# Altium PCB NB3000XN.PcbDoc (part 60 of 71)
Units mil, origin at the board's own origin, x right, y up, seen from the top; angles counter-clockwise.
Board outline 9527.56 x 6929.77 mil, 6 copper layers (Top Layer, GND+SHIELD, MidLayer1, MidLayer2, P2 - 3V3+5V0, Bottom Layer), stack 62.375 mil thick; 832 components, 1027 nets, 4655 pads, 4981 vias.
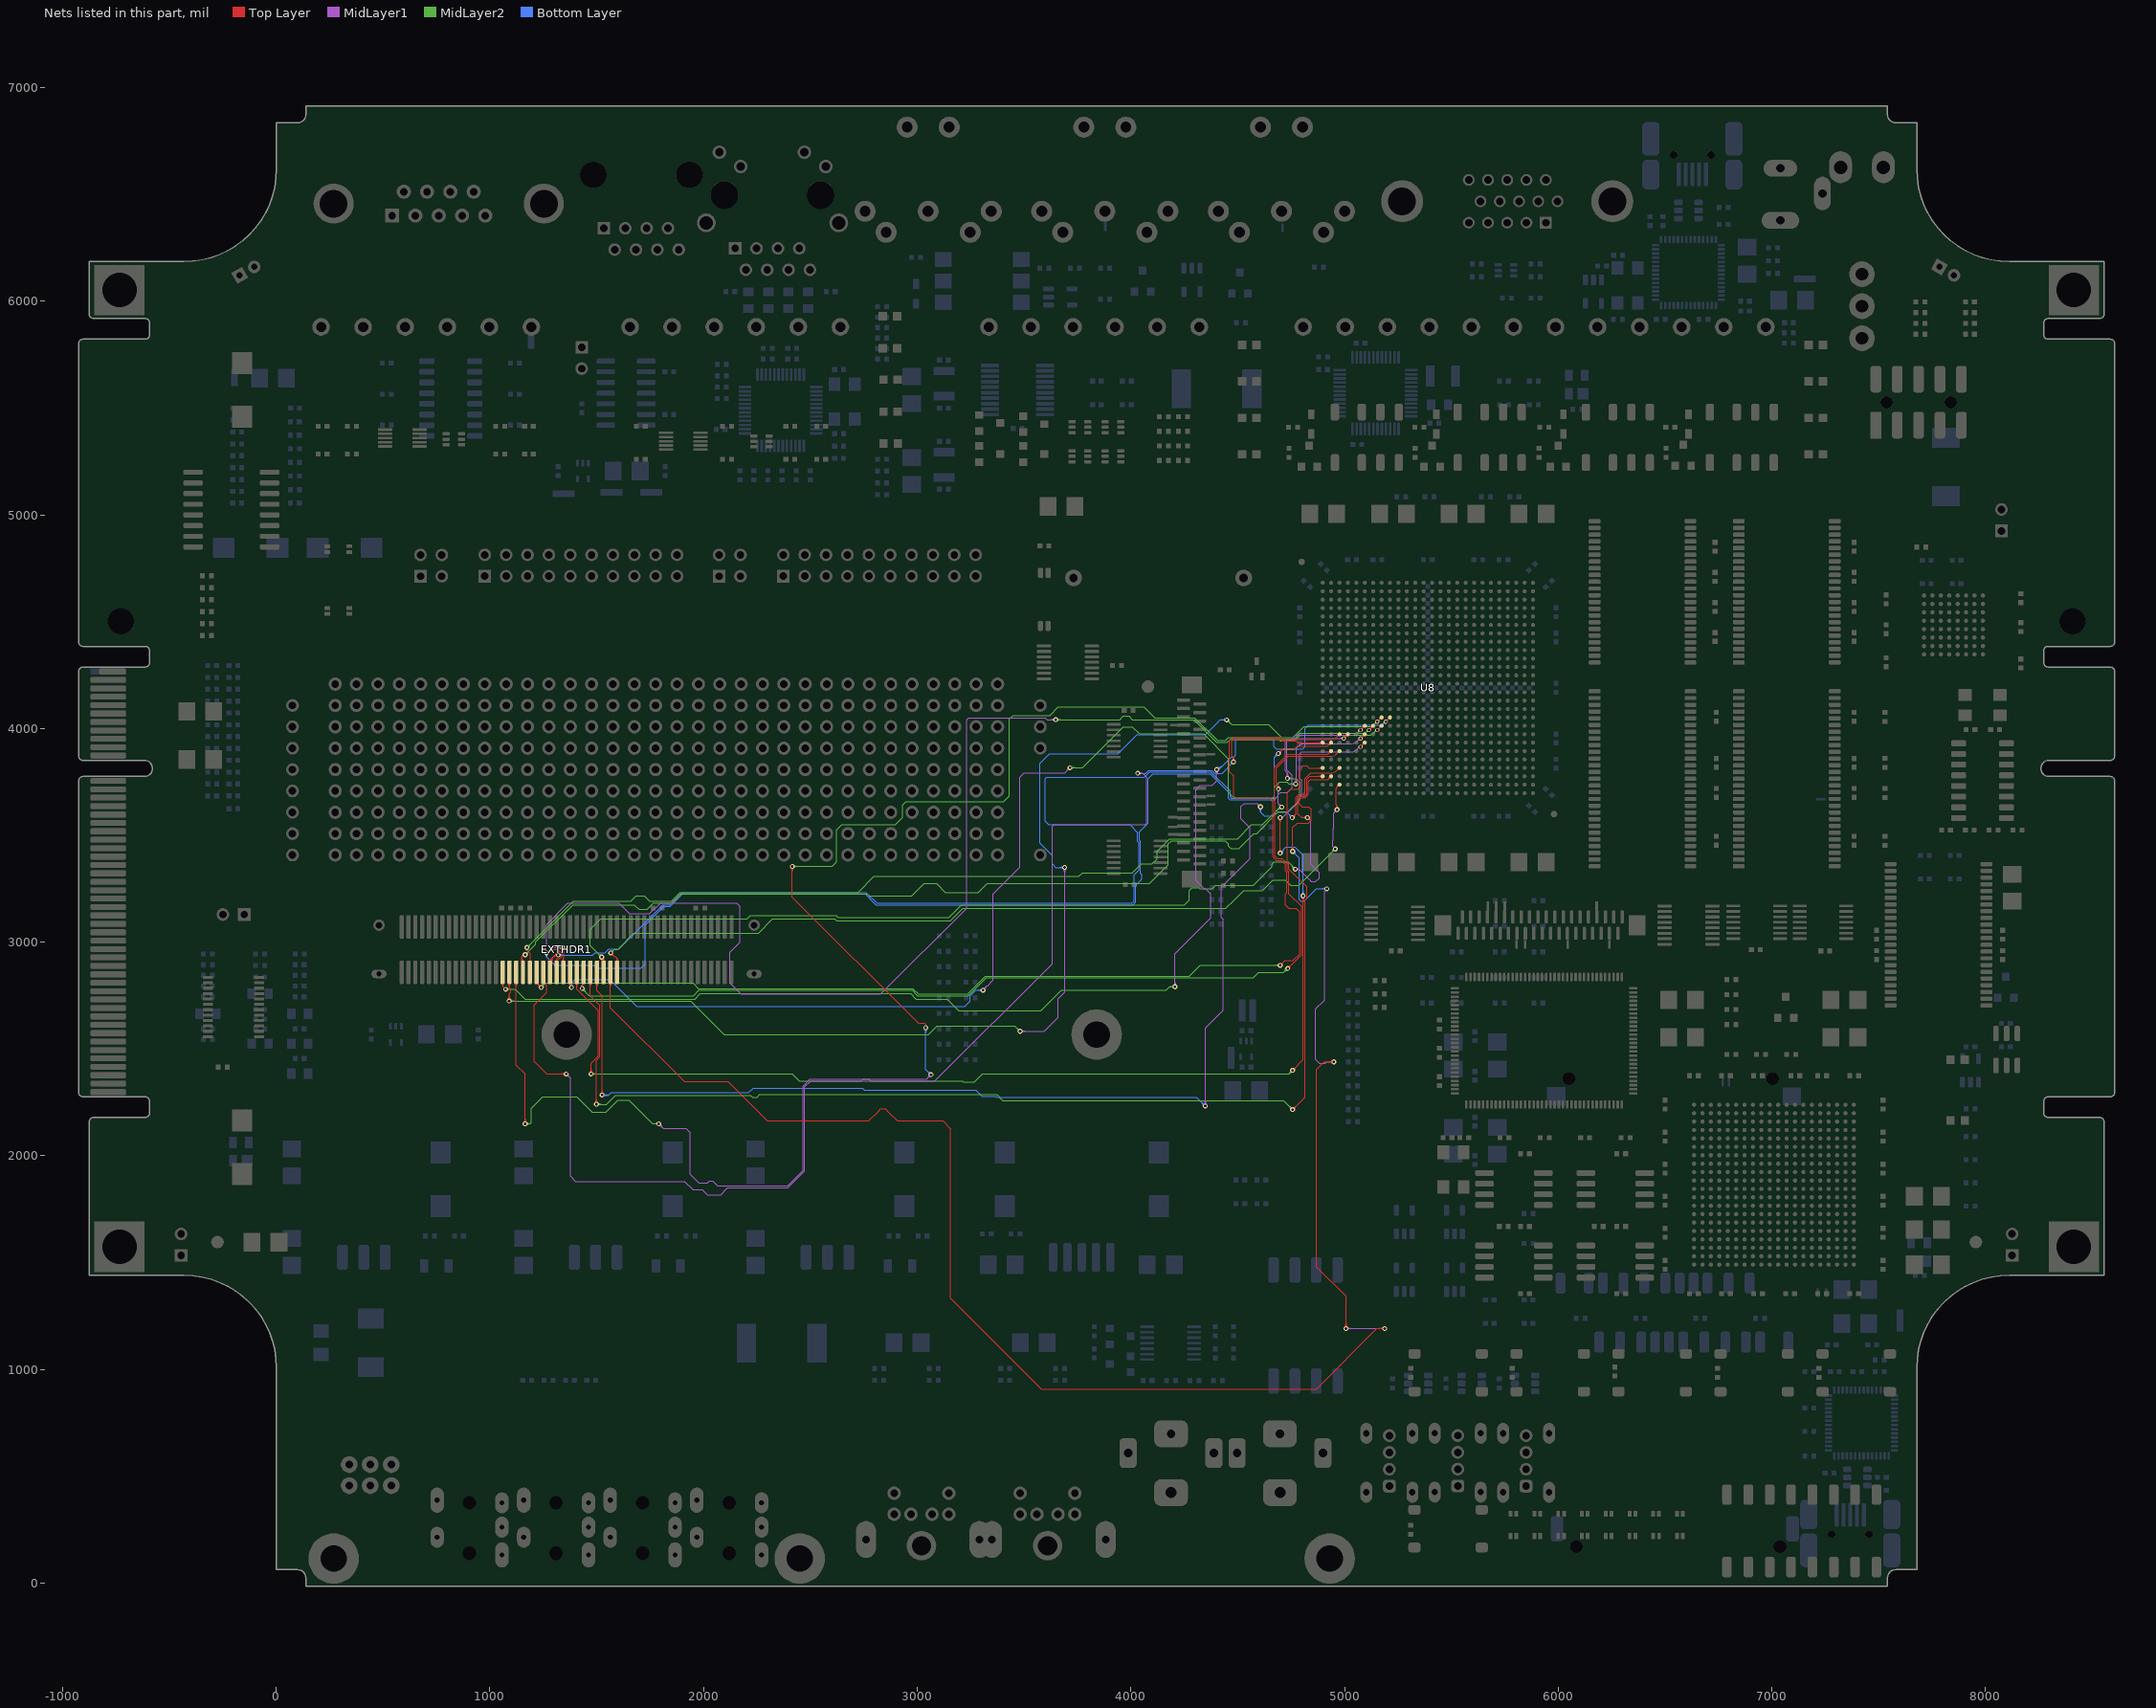
[diagram p64: the nets of this part, all layers, seen from the top]

## Via types
v1: diameter 23, hole 11.81, Top Layer to Bottom Layer, 3672 vias
v2: diameter 26, hole 11.81, Top Layer to Bottom Layer, 461 vias
v3: diameter 19, hole 11.81, Top Layer to Bottom Layer, tented both sides, 396 vias
v4: diameter 23.62, hole 11.81, Top Layer to Bottom Layer, 288 vias
v5: diameter 20, hole 11.81, Top Layer to Bottom Layer, 91 vias
v6: diameter 23, hole 11.81, Top Layer to Bottom Layer, tented both sides, 50 vias
v7: diameter 31, hole 11.81, Top Layer to Bottom Layer, 15 vias
v8: diameter 27.56, hole 11.81, Top Layer to Bottom Layer, tented both sides, 4 vias
v9: diameter 29, hole 11.81, Top Layer to Bottom Layer, 3 vias
v10: diameter 21, hole 11.81, Top Layer to Bottom Layer, 1 vias

## Nets (pads, with @x,y where several pads share a name; then routed paths per layer and width w, separated by ;. In a path a pad name is that pad's centre, name@x,y a point inside that pad or via, vN(x,y) a via of type N, cw(c..) or ccw(c..) an arc to the next point about the centre after c; other vN are vias at no path point) (continued)
PBIO.D17: EXTHDR1.36 U8.AE3 | length 4379.4
  Top Layer w4: v1@1565.19,2940.54 cw(c1565.19,2917.61) 1581.41,2933.82 cw(c1597.63,2950.04) v1@1574.69,2950.04 ; v1@1565.19,2944.54 cw(c1565.19,2931.26) 1574.58,2940.65 cw(c1583.97,2950.04) v1@1570.69,2950.04 ; v1(1565.19,2950.04) 1581.86,2933.37 1587.89,2933.37 1595.89,2925.37 EXTHDR1.36@1595.89,2859.25 ; EXTHDR1.36@1590.23,2910.03 ccw(c1576.57,2923.68) 1595.89,2923.68 ccw(c1615.2,2923.68) EXTHDR1.36@1601.55,2910.03 ; v1@4959.39,3627.9 ccw(c4950.27,3639.71) 4965.19,3639.71 ; v1(4965.19,3620.37) 4965.19,3639.71 ; v1@4970.99,3627.9 cw(c4980.11,3639.71) 4965.19,3639.71 ; 4961.11,3717.53 cw(c4971.26,3717.53) 4964.08,3724.71 ; 4961.11,3717.53 cw(c4971.26,3717.53) 4964.08,3724.71 ; 4961.11,3717.53 4961.11,3670 4961.11,3660 4961.11,3643.71 4962.44,3642.37 4962.52,3642.37 4965.19,3639.71 ; 4964.08,3724.71 cw(c4976.61,3712.17) 4976.61,3729.9 ccw(c4976.61,3712.17) 4964.08,3724.71 ; 4964.08,3724.71 ccw(c4951.55,3737.24) 4969.27,3737.24 cw(c4951.55,3737.24) 4964.08,3724.71
  MidLayer1 w4: v1@4955.69,3620.37 cw(c4932.76,3620.37) 4948.97,3604.16 cw(c4965.19,3587.94) v1@4965.19,3610.87 ; v1(4956.86,3436.71) 4945,3448.56 4945,3477.48 4947.52,3480 4947.52,3532.37 4948.52,3533.37 4948.52,3603.71 v1(4965.19,3620.37) ; v1@4959.69,3620.37 cw(c4946.41,3620.37) 4955.8,3610.99 cw(c4965.19,3601.6) v1@4965.19,3614.87
  MidLayer2 w4: v1(1565.19,2950.04) 1581.86,2966.71 1598.52,2966.71 1673.52,3041.71 2256.86,3041.71 2323.86,3108.71 2614.25,3108.71 2622.58,3100.37 3154.82,3100.37 3213.15,3158.71 4444.52,3158.71 4485.26,3199.44 4519.19,3233.37 4527.86,3242.04 4616.86,3242.04 4636.33,3261.52 4665.19,3290.37 4723.52,3290.37 4747.19,3266.71 4786.86,3266.71 v1(4956.86,3436.71) ; v1@1565.19,2955.54 ccw(c1565.19,2968.82) 1574.58,2959.43 ccw(c1583.97,2950.04) v1@1570.69,2950.04 ; v1@1565.19,2959.54 ccw(c1565.19,2982.48) 1581.41,2966.26 ccw(c1597.63,2950.04) v1@1574.69,2950.04 ; v1@4947.36,3436.71 cw(c4924.42,3436.71) 4940.64,3420.49 cw(c4956.86,3404.27) v1@4956.86,3427.21 ; v1@4951.36,3436.71 cw(c4938.08,3436.71) 4947.47,3427.32 cw(c4956.86,3417.93) v1@4956.86,3431.21
PBIO.D18: EXTHDR1.38 U8.AD2 | length 9271.8
  Top Layer w4: EXTHDR1.38@1558.74,2808.48 cw(c1545.08,2794.82) 1564.39,2794.82 cw(c1583.71,2794.82) EXTHDR1.38@1570.05,2808.48 ; EXTHDR1.38@1564.39,2859.25 1564.39,2692.51 ; 1614.73,2642.17 1564.39,2692.51 ; 2127.29,2334.02 2114.31,2347 ; v1@4750.14,3431.76 ccw(c4733.92,3447.98) 4756.86,3447.98 ccw(c4779.79,3447.98) v1@4763.57,3431.76 ; v1@4752.97,3428.93 ccw(c4743.58,3438.32) 4756.86,3438.32 ccw(c4770.14,3438.32) v1@4760.75,3428.93 ; v1(4756.86,3425.04) 4756.86,3536.86 4778.37,3558.37 4831.86,3558.37 4843.86,3570.37 4843.86,3621.37 4831.86,3633.37 4802.52,3633.37 4789.19,3646.71 4789.19,3666.71 4797.52,3675.04 4815.19,3675.04 4831.86,3691.71 4831.86,3753.17 4839.79,3761.11 4855.26,3761.11 4860,3761.11 4870,3761.11 4917.53,3761.11 ; v1@4943.28,2433.28 ccw(c4927.06,2417.06) 4927.06,2440 ccw(c4927.06,2462.93) v1@4943.28,2446.72 ; v1@4946.11,2436.11 ccw(c4936.72,2426.72) 4936.72,2440 ccw(c4936.72,2453.28) v1@4946.11,2443.89 ; v1(4950,2440) 4905,2440 4870,2405 4870,1480.19 5006.86,1343.33 v1(5006.86,1191.71) ; v1@5000.14,1198.43 ccw(c4983.92,1214.64) 5006.86,1214.64 ccw(c5029.79,1214.64) v1@5013.57,1198.43 ; v1@5002.97,1195.6 ccw(c4993.58,1204.99) 5006.86,1204.99 ccw(c5020.14,1204.99) v1@5010.75,1195.6 ; v1@5181.57,1184.99 ccw(c5165.36,1168.77) 5165.36,1191.71 ccw(c5165.36,1214.64) v1@5181.57,1198.43 ; v1@5184.4,1187.82 ccw(c5175.01,1178.43) 5175.01,1191.71 ccw(c5175.01,1204.99) v1@5184.4,1195.6 ; v1(5188.29,1191.71) 5151.71,1191.71 4868.37,908.37 3581.86,908.37 3156.86,1333.37 3156.86,2126.83 3119.69,2164 2907.06,2164 2865.5,2205.56 2850.56,2220.5 2829.44,2220.5 2814.5,2205.56 2772.94,2164 2297.31,2164 2114.31,2347 ; 1564.39,2692.51 1909.9,2347 2114.31,2347 ; 4917.53,3761.11 ccw(c4917.53,3771.26) 4924.71,3764.08 ; 4917.53,3761.11 ccw(c4917.53,3771.26) 4924.71,3764.08 ; 4924.71,3764.08 ccw(c4912.17,3776.61) 4929.9,3776.61 cw(c4912.17,3776.61) 4924.71,3764.08 ; 4924.71,3764.08 cw(c4937.24,3751.55) 4937.24,3769.27 ccw(c4937.24,3751.55) 4924.71,3764.08
  MidLayer1 w4: v1(4916.86,3250.04) 4906.86,3240.04 4906.86,2755 4906.86,2729.06 4865.19,2687.39 4865.19,2683.37 4865.19,2669 4865.19,2450.04 4881.86,2433.37 4910,2433.37 4916.63,2440 v1(4950,2440) ; v1@4943.28,2433.28 ccw(c4927.06,2417.06) 4927.06,2440 ccw(c4927.06,2462.93) v1@4943.28,2446.72 ; v1@4946.11,2436.11 ccw(c4936.72,2426.72) 4936.72,2440 ccw(c4936.72,2453.28) v1@4946.11,2443.89 ; v1(5006.86,1191.71) v1(5188.29,1191.71) ; v1@5010.75,1187.82 cw(c5020.14,1178.43) 5020.14,1191.71 cw(c5020.14,1204.99) v1@5010.75,1195.6 ; v1@5013.57,1184.99 cw(c5029.79,1168.77) 5029.79,1191.71 cw(c5029.79,1214.64) v1@5013.57,1198.43 ; v1@5181.57,1184.99 ccw(c5165.36,1168.77) 5165.36,1191.71 ccw(c5165.36,1214.64) v1@5181.57,1198.43 ; v1@5184.4,1187.82 ccw(c5175.01,1178.43) 5175.01,1191.71 ccw(c5175.01,1204.99) v1@5184.4,1195.6
  Bottom Layer w4: v1@4756.86,3415.54 cw(c4756.86,3392.61) 4773.07,3408.82 cw(c4789.29,3425.04) v1@4766.36,3425.04 ; v1@4756.86,3419.54 cw(c4756.86,3406.26) 4766.25,3415.65 cw(c4775.64,3425.04) v1@4762.36,3425.04 ; v1(4756.86,3425.04) 4787.86,3394.04 4787.86,3198.04 4794.19,3191.71 4811.19,3191.71 4869.52,3250.04 v1(4916.86,3250.04) ; v1@4910.14,3243.32 ccw(c4893.92,3227.11) 4893.92,3250.04 ccw(c4893.92,3272.98) v1@4910.14,3256.76 ; v1@4912.97,3246.15 ccw(c4903.58,3236.76) 4903.58,3250.04 ccw(c4903.58,3263.32) v1@4912.97,3253.93
PBIO.D19: EXTHDR1.40 U8.AD1 | length 4887.7
  Top Layer w4: v1@1516.81,2923.66 cw(c1477.96,2884.81) EXTHDR1.40@1532.9,2884.81 ; v1@1519.64,2926.49 cw(c1487.62,2894.47) EXTHDR1.40@1532.9,2894.47 ; v1@1522.46,2929.31 cw(c1497.27,2904.13) EXTHDR1.40@1532.9,2904.13 ; v1(1523.52,2930.37) 1532.9,2921 ; v1@1525.29,2932.14 cw(c1506.93,2913.78) EXTHDR1.40@1532.9,2913.78 ; EXTHDR1.40@1527.9,2910.62 ccw(c1519.61,2921) 1532.9,2921 ; EXTHDR1.40@1532.9,2859.25 1532.9,2921 ; EXTHDR1.40@1537.89,2910.62 cw(c1546.19,2921) 1532.9,2921 ; v1@4819.47,3576.66 ccw(c4803.26,3560.44) 4803.26,3583.37 ccw(c4803.26,3606.31) v1@4819.47,3590.09 ; v1@4822.3,3579.49 ccw(c4812.91,3570.1) 4812.91,3583.37 ccw(c4812.91,3596.65) v1@4822.3,3587.26 ; v1(4826.19,3583.37) 4798.52,3583.37 4781.19,3600.71 4781.19,3674.23 4790,3683.04 4811.88,3683.04 4823.52,3694.69 4823.52,3763.33 4836.81,3776.61 4855.26,3776.61 4860,3776.61 4870,3776.61 U8.AD1@4897.87,3776.61 ; U8.AD1@4892.57,3771.31 ccw(c4879.77,3758.51) 4879.77,3776.61 ccw(c4879.77,3794.72) U8.AD1@4892.57,3781.92 ; U8.AD1@4892.68,3771.42 ccw(c4880.15,3758.89) 4880.15,3776.61 ccw(c4880.15,3794.34) U8.AD1@4892.68,3781.81
  MidLayer1 w4: v1(4769.86,3341.71) 4786.52,3341.71 ; v1@4778.03,3336.87 cw(c4786.52,3331.84) 4786.52,3341.71 ; v1@4778.03,3346.55 ccw(c4786.52,3351.58) 4786.52,3341.71 ; v1(4826.19,3583.37) 4841.19,3568.37 4841.19,3365.71 4881.86,3325.04 4881.86,3300.04 4865.19,3283.37 4844.86,3283.37 4786.52,3341.71
  MidLayer2 w4: v1@1514.02,2930.37 ccw(c1491.09,2930.37) 1507.31,2946.59 ccw(c1523.52,2962.81) v1@1523.52,2939.87 ; v1@1518.02,2930.37 ccw(c1504.75,2930.37) 1514.14,2939.76 ccw(c1523.52,2949.15) v1@1523.52,2935.87 ; v1(1523.52,2930.37) 1470,2983.9 1470,3060.2 1518.17,3108.37 2203.88,3108.37 2220.54,3125.04 2620.54,3125.04 2628.88,3116.71 3148.52,3116.71 3206.86,3175.04 4251.19,3175.04 4273.52,3197.37 4273.52,3242.71 4285.82,3255 4319.9,3255 4323.52,3251.37 4381.86,3251.37 4397.19,3266.71 4574.21,3266.71 4660,3352.5 4660,3365.04 4670,3375.04 4736.52,3375.04 v1(4769.86,3341.71) ; v1@4760.36,3341.71 ccw(c4737.42,3341.71) 4753.64,3357.93 ccw(c4769.86,3374.14) v1@4769.86,3351.21 ; v1@4764.36,3341.71 ccw(c4751.08,3341.71) 4760.47,3351.1 ccw(c4769.86,3360.49) v1@4769.86,3347.21
PBIO.D20: EXTHDR1.42 U8.AC3 | length 6337.2
  Top Layer w4: EXTHDR1.42@1495.74,2808.48 cw(c1482.09,2794.82) 1501.4,2794.82 cw(c1520.71,2794.82) EXTHDR1.42@1507.06,2808.48 ; EXTHDR1.42@1501.4,2859.25 1501.4,2773.6 1525,2750 v1(1525,2285) ; v1@1518.28,2291.72 ccw(c1502.06,2307.93) 1525,2307.93 ccw(c1547.93,2307.93) v1@1531.72,2291.72 ; v1@1521.11,2288.89 ccw(c1511.72,2298.28) 1525,2298.28 ccw(c1538.28,2298.28) v1@1528.89,2288.89 ; v1(4755.52,3583.37) 4772.86,3600.71 4772.86,3677.86 4786.04,3691.04 4808.56,3691.04 4815.19,3697.67 4815.19,3766.31 4841,3792.12 4860,3792.12 4870,3792.12 4936.73,3792.12 ; v1@4755.52,3588.87 ccw(c4755.52,3602.15) 4764.91,3592.76 ccw(c4774.3,3583.37) v1@4761.02,3583.37 ; v1@4755.52,3592.87 ccw(c4755.52,3615.81) 4771.74,3599.59 ccw(c4787.96,3583.37) v1@4765.02,3583.37 ; 4936.73,3792.12 ccw(c4936.73,3830.8) 4964.08,3803.45 cw(c4936.73,3830.8) 4936.73,3792.12 ; 4964.08,3803.45 cw(c4976.61,3790.92) 4976.61,3808.64 ccw(c4976.61,3790.92) 4964.08,3803.45 ; 4964.08,3803.45 ccw(c4951.55,3815.98) 4969.27,3815.98 cw(c4951.55,3815.98) 4964.08,3803.45
  MidLayer1 w4: v1@4341.81,2240.09 ccw(c4325.59,2256.31) 4348.52,2256.31 ccw(c4371.46,2256.31) v1@4355.24,2240.09 ; v1@4344.64,2237.26 ccw(c4335.25,2246.65) 4348.52,2246.65 ccw(c4361.8,2246.65) v1@4352.41,2237.26 ; v1(4348.52,2233.37) 4348.52,2599.43 4431.86,2682.77 4431.86,3107.08 4423.52,3115.42 4423.52,3258.37 4556.86,3391.71 4556.86,3536.04 4515.19,3577.71 4515.19,3635.19 4530,3650 4590.23,3650 v1(4606.86,3633.37) v1@4598.52,3633.37 ; v1@4597.36,3633.37 ccw(c4574.42,3633.37) 4590.64,3649.59 ccw(c4606.86,3665.81) v1@4606.86,3642.87 ; v1@4601.36,3633.37 ccw(c4588.08,3633.37) 4597.47,3642.76 ccw(c4606.86,3652.15) v1@4606.86,3638.87
  Bottom Layer w4: v1@1528.89,2281.11 cw(c1538.28,2271.72) 1538.28,2285 cw(c1538.28,2298.28) 1528.89,2288.89 ccw(c1542.2,2302.2) 1542.2,2283.37 ; 1544.01,2283.37 ccw(c1544.01,2265.99) 1531.72,2278.28 cw(c1547.93,2262.06) 1547.93,2285 cw(c1547.93,2307.93) 1531.72,2291.72 ccw(c1551.86,2311.86) 1551.86,2283.37 ; v1@4339.02,2233.37 ccw(c4316.09,2233.37) 4332.31,2249.59 ccw(c4348.52,2265.81) v1@4348.52,2242.87 ; v1@4342.65,2227.5 v1(4348.52,2233.37) 4307.02,2274.87 3372.5,2274.87 3368.88,2278.5 3304.39,2278.5 3275.39,2307.5 2752.75,2307.5 2742.75,2317.5 2232.75,2317.5 2211.27,2296.02 1567.65,2296.02 1556.63,2285 ; v1@4343.02,2233.37 ccw(c4329.75,2233.37) 4339.14,2242.76 ccw(c4348.52,2252.15) v1@4348.52,2238.87 ; v1@4600.14,3626.66 cw(c4583.92,3610.44) 4606.86,3610.44 cw(c4629.79,3610.44) v1@4613.57,3626.66 ; v1@4602.97,3629.49 cw(c4593.58,3620.1) 4606.86,3620.1 cw(c4620.14,3620.1) v1@4610.75,3629.49 ; v1(4606.86,3633.37) 4606.86,3608.14 4625,3590 4660,3590 4678.37,3608.37 4730.52,3608.37 v1(4755.52,3583.37) v1@4765.19,3583.37 ; v1@4746.02,3583.37 ccw(c4723.09,3583.37) 4739.31,3599.59 ccw(c4755.52,3615.81) v1@4755.52,3592.87 ; v1@4750.02,3583.37 ccw(c4736.75,3583.37) 4746.14,3592.76 ccw(c4755.52,3602.15) v1@4755.52,3588.87 ; 1556.63,2285 v1(1525,2285) 1526.63,2283.37 1555,2283.37 1556.63,2285
PBIO.D21: EXTHDR1.44 U8.AC1 | length 6090
  Top Layer w4: EXTHDR1.44@1464.25,2808.48 cw(c1450.59,2794.82) 1469.9,2794.82 cw(c1489.22,2794.82) EXTHDR1.44@1475.56,2808.48 ; EXTHDR1.44@1469.9,2859.25 1469.9,2750 1515.19,2704.71 1515.19,2463.73 1498.52,2447.06 v1(1498.52,2241.71) ; v1@1491.81,2248.43 ccw(c1475.59,2264.64) 1498.52,2264.64 ccw(c1521.46,2264.64) v1@1505.24,2248.43 ; v1@1494.64,2245.6 ccw(c1485.25,2254.99) 1498.52,2254.99 ccw(c1511.8,2254.99) v1@1502.41,2245.6 ; v1(4756.86,2216.71) 4814.86,2274.71 4814.86,3196.33 4823.52,3205 4823.52,3259.37 4740.19,3342.71 4740.19,3369.69 4732.19,3377.69 4732.19,3700.37 4748.52,3716.71 4781.86,3716.71 4790.19,3725.04 4790.19,3808.37 4806.86,3825.04 4824.96,3825.04 4834.01,3815.99 4851.26,3815.99 4855.26,3815.98 4860,3815.98 4870,3815.98 U8.AC1@4897.87,3815.98 ; v1@4756.86,2222.21 ccw(c4756.86,2235.49) 4766.25,2226.1 ccw(c4775.64,2216.71) v1@4762.36,2216.71 ; v1@4756.86,2226.21 ccw(c4756.86,2249.14) 4773.07,2232.93 ccw(c4789.29,2216.71) v1@4766.36,2216.71 ; U8.AC1@4892.57,3810.68 ccw(c4879.77,3797.88) 4879.77,3815.98 ccw(c4879.77,3834.09) U8.AC1@4892.57,3821.29 ; U8.AC1@4892.68,3810.79 ccw(c4880.15,3798.26) 4880.15,3815.98 ccw(c4880.15,3833.71) U8.AC1@4892.68,3821.18
  MidLayer2 w4: v1(1498.52,2241.71) 1546.31,2241.71 1588.61,2284 2219.94,2284 2229.44,2274.5 2250.56,2274.5 2262.56,2286.5 3372.19,2286.5 3399.98,2258.71 4714.86,2258.71 v1(4756.86,2216.71) ; v1@1502.41,2237.82 cw(c1511.8,2228.43) 1511.8,2241.71 cw(c1511.8,2254.99) v1@1502.41,2245.6 ; v1@1505.24,2234.99 cw(c1521.46,2218.77) 1521.46,2241.71 cw(c1521.46,2264.64) v1@1505.24,2248.43 ; v1@4747.36,2216.71 ccw(c4724.42,2216.71) 4740.64,2232.93 ccw(c4756.86,2249.14) v1@4756.86,2226.21 ; v1@4751.36,2216.71 ccw(c4738.08,2216.71) 4747.47,2226.1 ccw(c4756.86,2235.49) v1@4756.86,2222.21
PBIO.D22: EXTHDR1.46 U8.AA2 | length 5033.5
  Top Layer w4: v1@1427.03,2791.56 ccw(c1422.06,2800) 1431.86,2800 ccw(c1441.65,2800) v1@1436.68,2791.56 ; v1(1431.86,2783.37) 1431.86,2800 1438.41,2806.55 EXTHDR1.46@1438.41,2859.25 ; v1(4733.86,2877.04) 4798.52,2941.71 4798.52,3166.71 4739.19,3226.04 4739.19,3329.02 4731.86,3336.36 4731.86,3366.71 4706.86,3391.71 4684.84,3391.71 4673.52,3403.02 4673.52,3682.37 4672.52,3683.37 4672.52,3817.52 4734.22,3879.22 4860,3879.22 4870,3879.22 4917.53,3879.22 ; v1@4733.86,2882.54 ccw(c4733.86,2895.82) 4743.25,2886.43 ccw(c4752.64,2877.04) v1@4739.36,2877.04 ; v1@4733.86,2886.54 ccw(c4733.86,2909.48) 4750.07,2893.26 ccw(c4766.29,2877.04) v1@4743.36,2877.04 ; 4917.53,3879.22 ccw(c4917.53,3889.37) 4924.71,3882.19 ; 4917.53,3879.22 ccw(c4917.53,3889.37) 4924.71,3882.19 ; 4924.71,3882.19 ccw(c4912.17,3894.72) 4929.9,3894.72 cw(c4912.17,3894.72) 4924.71,3882.19 ; 4924.71,3882.19 cw(c4937.24,3869.66) 4937.24,3887.38 ccw(c4937.24,3869.66) 4924.71,3882.19
  MidLayer2 w4: v1@1431.86,2773.87 cw(c1431.86,2750.94) 1448.07,2767.16 cw(c1464.29,2783.37) v1@1441.36,2783.37 ; v1@1431.86,2777.87 cw(c1431.86,2764.6) 1441.25,2773.99 cw(c1450.64,2783.37) v1@1437.36,2783.37 ; v1(1431.86,2783.37) 1465.19,2750.04 1935,2750.04 1950,2750.04 1953.35,2750.04 1978.69,2775.37 2010,2775.37 2976.33,2775.37 3001.67,2750.04 3239.52,2750.04 3322.86,2833.37 4573.52,2833.37 4598.52,2858.37 4715.19,2858.37 v1(4733.86,2877.04) ; v1@4724.36,2877.04 cw(c4701.42,2877.04) 4717.64,2860.82 cw(c4733.86,2844.61) v1@4733.86,2867.54 ; v1@4728.36,2877.04 cw(c4715.08,2877.04) 4724.47,2867.65 cw(c4733.86,2858.26) v1@4733.86,2871.54
PBIO.D23: EXTHDR1.48 U8.Y6 | length 6533
  Top Layer w4: EXTHDR1.48@1401.26,2808.48 cw(c1387.73,2794.95) 1406.86,2794.95 ; 1406.86,2794.69 cw(c1426.36,2794.69) EXTHDR1.48@1412.57,2808.48 ; EXTHDR1.48@1406.86,2859.25 1406.86,2780 1506.86,2680 1506.86,2627.37 1506.86,2625 1506.86,2466.71 1473.52,2433.37 v1(1473.52,2383.37) ; v1@1466.81,2390.09 ccw(c1450.59,2406.31) 1473.52,2406.31 ccw(c1496.46,2406.31) v1@1480.24,2390.09 ; v1@1469.64,2387.26 ccw(c1460.25,2396.65) 1473.52,2396.65 ccw(c1486.8,2396.65) v1@1477.41,2387.26 ; v1@4691.81,3423.43 ccw(c4675.59,3439.64) 4698.52,3439.64 ccw(c4721.46,3439.64) v1@4705.24,3423.43 ; v1@4691.81,3576.66 cw(c4675.59,3560.44) 4698.52,3560.44 cw(c4721.46,3560.44) v1@4705.24,3576.66 ; v1@4694.64,3420.6 ccw(c4685.25,3429.99) 4698.52,3429.99 ccw(c4711.8,3429.99) v1@4702.41,3420.6 ; v1@4694.64,3579.49 cw(c4685.25,3570.1) 4698.52,3570.1 cw(c4711.8,3570.1) v1@4702.41,3579.49 ; v1(4698.52,3416.71) v1(4698.52,3583.37) ; v1(4756.86,2400.04) 4806.86,2450.04 4806.86,3215.37 v1(4805.52,3216.71) ; v1@4756.86,2405.54 ccw(c4756.86,2418.82) 4766.25,2409.43 ccw(c4775.64,2400.04) v1@4762.36,2400.04 ; v1@4756.86,2409.54 ccw(c4756.86,2432.48) 4773.07,2416.26 ccw(c4789.29,2400.04) v1@4766.36,2400.04 ; v1@4798.81,3209.99 cw(c4779.37,3190.55) 4806.86,3190.55 ; v1@4801.64,3212.82 cw(c4789.03,3200.21) 4806.86,3200.21 ; 4806.86,3196.99 cw(c4825.24,3196.99) v1@4812.24,3209.99 ; v3(5075.04,3914.41) U8.Y6@5094.72,3934.09 ; U8.Y6@5087.22,3934.09 cw(c5069.12,3934.09) 5081.92,3921.29 cw(c5094.72,3908.49) U8.Y6@5094.72,3926.59 ; U8.Y6@5087.38,3934.09 cw(c5069.66,3934.09) 5082.19,3921.56 cw(c5094.72,3909.03) U8.Y6@5094.72,3926.75 ; 5087.84,3927.21 cw(c5075.04,3940.02) 5075.04,3921.91 ccw(c5075.04,3940.02) 5087.84,3927.21 ; 5087.84,3927.21 ccw(c5100.65,3914.41) 5082.54,3914.41 cw(c5100.65,3914.41) 5087.84,3927.21
  MidLayer1 w4: v1(4698.52,3583.37) 4710.86,3583.37 4781.86,3654.37 4781.86,3675.04 4798.52,3691.71 4798.52,3759.71 4791.52,3766.71 4791.52,3881.52 4800.55,3890.55 4860,3890.55 4870,3890.55 4918.62,3890.55 4938.04,3890.55 5012.16,3890.55 ; 4998.23,3890.55 5012.16,3890.55 ; v3@5067.65,3915.71 cw(c5049.82,3918.86) 5060.21,3904.02 ; v3@5073.74,3907.02 ccw(c5070.59,3889.19) 5060.21,3904.02 ; 5012.16,3890.55 5035.41,3890.55 ; 5035.41,3890.55 ccw(c5035.41,3914.32) 5035.58,3890.55 ; 5035.41,3890.55 5035.58,3890.55 ; 5035.58,3890.55 ccw(c5035.41,3914.32) 5051.63,3896.94 5060.21,3904.02
  MidLayer2 w4: v1(1473.52,2383.37) 2414,2383.37 2447.34,2350.04 2737.66,2350.04 2746.12,2358.5 2773.88,2358.5 2782.34,2350.04 3211.19,2350.04 3215.19,2346.04 3267.67,2346.04 3305,2383.37 4740.19,2383.37 v1(4756.86,2400.04) ; v1@1477.41,2379.49 cw(c1486.8,2370.1) 1486.8,2383.37 cw(c1486.8,2396.65) v1@1477.41,2387.26 ; v1@1480.24,2376.66 cw(c1496.46,2360.44) 1496.46,2383.37 cw(c1496.46,2406.31) v1@1480.24,2390.09 ; v1@4747.36,2400.04 cw(c4724.42,2400.04) 4740.64,2383.82 cw(c4756.86,2367.61) v1@4756.86,2390.54 ; v1@4751.36,2400.04 cw(c4738.08,2400.04) 4747.47,2390.65 cw(c4756.86,2381.26) v1@4756.86,2394.54
  Bottom Layer w4: v1(4698.52,3416.71) 4726.19,3444.37 4767.52,3444.37 4805.52,3406.37 v1(4805.52,3216.71) ; v1@4698.52,3422.21 ccw(c4698.52,3435.49) 4707.91,3426.1 ccw(c4717.3,3416.71) v1@4704.02,3416.71 ; v1@4698.52,3426.21 ccw(c4698.52,3449.14) 4714.74,3432.93 ccw(c4730.96,3416.71) v1@4708.02,3416.71 ; v1@4798.81,3223.43 ccw(c4782.59,3239.64) 4805.52,3239.64 ccw(c4828.46,3239.64) v1@4812.24,3223.43 ; v1@4801.64,3220.6 ccw(c4792.25,3229.99) 4805.52,3229.99 ccw(c4818.8,3229.99) v1@4809.41,3220.6
PBIO.D24: EXTHDR1.50 U8.W6 | length 5998.1
  Top Layer w4: EXTHDR1.50@1371.07,2807.42 cw(c1358.23,2787.58) v1@1381.86,2787.58 ; EXTHDR1.50@1373.24,2810.77 cw(c1362.99,2794.94) v1@1381.86,2794.94 ; EXTHDR1.50@1375.42,2814.13 cw(c1367.75,2802.29) 1381.86,2802.29 ; EXTHDR1.50@1375.42,2859.25 1375.42,2811.44 1381.86,2805 v1(1381.86,2788.37) ; v1@1377.03,2796.56 ccw(c1372.06,2805) 1381.86,2805 ccw(c1391.65,2805) v1@1386.68,2796.56 ; v3(5075.04,3953.78) U8.W6@5094.72,3973.46 ; U8.W6@5087.22,3973.46 cw(c5069.12,3973.46) 5081.92,3960.66 cw(c5094.72,3947.86) U8.W6@5094.72,3965.96 ; U8.W6@5087.38,3973.46 cw(c5069.66,3973.46) 5082.19,3960.93 cw(c5094.72,3948.4) U8.W6@5094.72,3966.12 ; 5087.84,3966.58 ccw(c5100.65,3953.78) 5082.54,3953.78 cw(c5100.65,3953.78) 5087.84,3966.58 ; 5087.84,3966.58 cw(c5075.04,3979.39) 5075.04,3961.28 ccw(c5075.04,3979.39) 5087.84,3966.58
  MidLayer1 w4: v1(3307.86,2775.04) 3311.19,2775.04 3315.19,2779.04 3315.19,2783.37 3326.71,2794.9 ; v1@3307.86,2780.54 ccw(c3307.86,2791.4) 3315.54,2783.72 ; v1@3307.86,2784.54 ccw(c3307.86,2805.06) 3322.37,2790.55 ; v1@3313.36,2775.04 cw(c3329.05,2775.04) 3317.95,2786.14 ; v1@3317.36,2775.04 cw(c3342.71,2775.04) 3324.78,2792.97 ; 3327.21,2794.4 3355,2822.18 3355,3225 3481.52,3351.52 3481.52,3771.73 3501.5,3791.71 3690.19,3791.71 v1(3715.19,3816.71) ; v1@3705.69,3816.71 cw(c3682.76,3816.71) 3698.97,3800.49 cw(c3715.19,3784.27) v1@3715.19,3807.21 ; v1@3709.69,3816.71 cw(c3696.41,3816.71) 3705.8,3807.32 cw(c3715.19,3797.93) v1@3715.19,3811.21 ; v1@4765.14,3747.09 ccw(c4740.88,3771.36) 4775.19,3771.36 ; v1@4767.97,3744.26 ccw(c4750.53,3761.7) 4775.19,3761.7 ; v1@4770.8,3741.44 ccw(c4760.19,3752.04) 4775.19,3752.04 ; v1(4771.86,3740.37) 4771.86,3741.71 4775.19,3745.04 4775.19,3908.37 4796.73,3929.92 4860,3929.92 4870,3929.92 4918.62,3929.92 4938.04,3929.92 5012.16,3929.92 ; 4775.19,3755.26 ccw(c4786.75,3755.26) v1@4778.57,3747.09 ; 4998.23,3929.92 5012.16,3929.92 ; v3@5067.57,3954.43 cw(c5049.53,3956.01) 5061.17,3942.14 ; v3@5074.39,3946.31 ccw(c5072.81,3928.27) 5061.17,3942.14 ; 5012.16,3929.92 5031.66,3929.92 ccw(c5031.66,3971.65) 5061.17,3942.14
  MidLayer2 w4: v1(3715.19,3816.71) 3773.52,3816.71 3965.19,4008.37 4006.86,4008.37 4040.19,3975.04 4340.19,3975.04 4456.86,3858.37 4456.86,3700.04 4481.86,3675.04 4665.19,3675.04 4672.52,3682.37 4672.52,3725.04 4696.52,3749.04 4730,3749.04 4738.67,3740.37 v1(4771.86,3740.37) ; v1@3719.08,3812.82 cw(c3728.47,3803.43) 3728.47,3816.71 cw(c3728.47,3829.99) v1@3719.08,3820.6 ; v1@3721.91,3809.99 cw(c3738.13,3793.77) 3738.13,3816.71 cw(c3738.13,3839.64) v1@3721.91,3823.43 ; v1@4765.14,3733.66 ccw(c4748.92,3717.44) 4748.92,3740.37 ccw(c4748.92,3763.31) v1@4765.14,3747.09 ; v1@4767.97,3736.49 ccw(c4758.58,3727.1) 4758.58,3740.37 ccw(c4758.58,3753.65) v1@4767.97,3744.26
  Bottom Layer w4: v1@1375.86,2795.74 ccw(c1365.56,2808.37) 1381.86,2808.37 ; v1@1378.38,2792.64 ccw(c1372.42,2799.95) 1381.86,2799.95 ccw(c1391.29,2799.95) v1@1385.33,2792.64 ; v1(1381.86,2788.37) 1381.86,2808.37 ; v1@1387.86,2795.74 cw(c1398.16,2808.37) 1381.86,2808.37 ; v1@3301.14,2768.32 ccw(c3284.92,2752.11) 3284.92,2775.04 ccw(c3284.92,2797.98) v1@3301.14,2781.76 ; v1@3303.97,2771.15 ccw(c3294.58,2761.76) 3294.58,2775.04 ccw(c3294.58,2788.32) v1@3303.97,2778.93 ; v1(3307.86,2775.04) 3273.52,2775.04 3248.52,2750.04 3248.52,2725.04 3223.52,2700.04 1687.21,2700.04 1562.21,2825.04 1398.52,2825.04 1381.86,2808.37
PBIO.D25: EXTHDR1.52 U8.V8 | length 6211.4
  Top Layer w4: EXTHDR1.52@1338.26,2910.03 ccw(c1324.61,2923.68) 1343.92,2923.68 ccw(c1363.23,2923.68) EXTHDR1.52@1349.58,2910.03 ; v1(1340.19,2975.04) 1340.19,2959.81 1345.5,2954.5 1345.5,2929.44 1343.92,2927.86 EXTHDR1.52@1343.92,2859.25 ; v3(5153.78,3993.15) U8.V8@5173.46,4012.83 ; v3@5161.28,3993.15 cw(c5179.39,3993.15) 5166.58,4005.95 ; v3@5161.28,3993.15 cw(c5179.39,3993.15) 5166.58,4005.95 ; U8.V8@5165.96,4012.83 cw(c5147.86,4012.83) 5160.66,4000.03 cw(c5173.46,3987.23) U8.V8@5173.46,4005.33 ; U8.V8@5166.12,4012.83 cw(c5148.4,4012.83) 5160.93,4000.3 cw(c5173.46,3987.77) U8.V8@5173.46,4005.49 ; 5166.58,4005.95 cw(c5153.78,4018.76) 5153.78,4000.65 ccw(c5153.78,4018.76) 5166.58,4005.95
  MidLayer1 w4: v1@1333.47,2968.32 ccw(c1317.26,2952.11) 1317.26,2975.04 ccw(c1317.26,2997.98) v1@1333.47,2981.76 ; v1@1336.3,2971.15 ccw(c1326.91,2961.76) 1326.91,2975.04 ccw(c1326.91,2988.32) v1@1336.3,2978.93 ; v1(1340.19,2975.04) 1281.86,2975.04 1265.19,2991.71 1265.19,3083.37 1365.19,3183.37 1603.88,3183.37 1653.88,3133.37 1748.17,3133.37 1798.5,3183.71 2154.98,3183.71 2170,3168.69 2170,2999.79 2123.52,2953.31 2123.52,2808.37 2174.77,2757.13 2830,2757.13 3231.86,3158.98 3231.86,4041.71 3240.19,4050.04 3600,4050.04 3608.33,4041.71 v1(3648.52,4041.71) ; v1@3641.81,4034.99 ccw(c3625.59,4018.77) 3625.59,4041.71 ccw(c3625.59,4064.64) v1@3641.81,4048.43 ; v1@3644.64,4037.82 ccw(c3635.25,4028.43) 3635.25,4041.71 ccw(c3635.25,4054.99) v1@3644.64,4045.6
  MidLayer2 w4: v1(3648.52,4041.71) 3948.52,4041.71 3965.19,4058.37 3990.19,4058.37 4006.52,4042.04 4294.86,4042.04 4303.52,4033.37 4400.86,3936.04 4451.19,3936.04 4465.19,3950.04 4690.19,3950.04 4698.52,3941.71 4765.8,3941.71 4793.38,3969.29 4860,3969.29 4870,3969.29 4997.36,3969.29 5016.78,3969.29 5090.9,3969.29 5114.15,3969.29 ccw(c5114.15,3993.06) 5130.37,3975.68 5138.95,3982.76 ; v1@3652.41,4037.82 cw(c3661.8,4028.43) 3661.8,4041.71 cw(c3661.8,4054.99) v1@3652.41,4045.6 ; v1@3655.24,4034.99 cw(c3671.46,4018.77) 3671.46,4041.71 cw(c3671.46,4064.64) v1@3655.24,4048.43 ; v3@5146.39,3994.45 cw(c5128.56,3997.6) 5138.95,3982.76 ; v3@5152.48,3985.76 ccw(c5149.33,3967.93) 5138.95,3982.76
PBIO.D26: EXTHDR1.54 U8.AA3 | length 5300.7
  Top Layer w4: v1(1265.19,2950.04) 1281.86,2966.71 1318.04,2966.71 1337.5,2947.25 1337.5,2932.75 1327.25,2922.5 1312.65,2922.5 1312.42,2922.27 ; v1@1265.19,2955.54 ccw(c1265.19,2968.82) 1274.58,2959.43 ccw(c1283.97,2950.04) v1@1270.69,2950.04 ; v1@1265.19,2959.54 ccw(c1265.19,2982.48) 1281.41,2966.26 ccw(c1297.63,2950.04) v1@1274.69,2950.04 ; EXTHDR1.54@1307.09,2910.33 ccw(c1296.39,2922.27) 1312.42,2922.27 ; EXTHDR1.54@1312.43,2904.36 EXTHDR1.54@1312.42,2859.25 1312.42,2922.27 ; EXTHDR1.54@1317.76,2910.33 cw(c1328.46,2922.27) 1312.42,2922.27 ; v1@4684.73,3724.48 ccw(c4677.33,3735) 4690.19,3735 ccw(c4703.05,3735) v1@4695.65,3724.48 ; v1(4690.19,3716.71) 4690.19,3735 4680.52,3744.67 4680.52,3814.21 4737.18,3870.86 4860,3870.86 4870,3870.86 4936.73,3870.86 ; 4936.73,3870.86 ccw(c4936.73,3909.54) 4964.08,3882.19 ; 4936.73,3870.86 ccw(c4936.73,3909.54) 4964.08,3882.19 ; 4964.08,3882.19 cw(c4976.61,3869.66) 4976.61,3887.38 ccw(c4976.61,3869.66) 4964.08,3882.19 ; 4964.08,3882.19 ccw(c4951.55,3894.72) 4969.27,3894.72 cw(c4951.55,3894.72) 4964.08,3882.19
  Bottom Layer w4: v1@1259.29,2942.6 cw(c1249.59,2930.38) 1265.19,2930.38 ; v1(1265.19,2950.04) 1265.19,2930.37 ; v1@1271.1,2942.6 ccw(c1280.79,2930.38) 1265.19,2930.38 ; 1792.34,3145.54 1813.5,3166.7 1843.16,3166.7 1901.5,3225.04 2756.86,3225.04 2806.86,3175.04 4010,3175.04 4023.19,3188.23 4023.19,3210 4023.19,3266 4052.19,3295 4052.19,3315 4045.52,3321.67 4045.52,3470.35 4040.19,3475.69 4040.19,3516.71 4069.16,3545.68 ; 1796.8,3150 1727,3080.2 1727,2897 1707.87,2877.87 1501.78,2877.87 1487.95,2891.71 1303.86,2891.71 1265.19,2930.37 ; 4073.52,3550.04 4069.16,3545.68 ; v1(4690.19,3716.71) 4690.19,3684.35 4672.21,3666.37 4463.63,3666.37 4456.86,3673.14 4456.86,3703.14 4371.63,3788.37 4103.37,3788.37 4080,3765 4080,3556.52 4069.16,3545.68
PBIO.D27: EXTHDR1.56 U8.Y2 | length 6007.2
  Top Layer w4: EXTHDR1.56@1276.93,2904.37 cw(c1294.82,2904.37) 1282.17,2917.02 ; EXTHDR1.56@1278.2,2911.89 ccw(c1276.79,2915.78) 1280.93,2915.78 ; EXTHDR1.56@1280.93,2859.25 1280.93,2915.78 ; EXTHDR1.56@1280.93,2904.37 cw(c1308.47,2904.37) 1289,2923.85 ; EXTHDR1.56@1283.65,2911.89 cw(c1285.06,2915.78) 1280.93,2915.78 ; EXTHDR1.56@1284.93,2904.37 cw(c1322.13,2904.37) 1295.82,2930.68 ; 1285.26,2920.11 cw(c1320,2885.37) v1@1320,2934.5 ; EXTHDR1.56@1288.93,2904.37 cw(c1335.79,2904.37) 1302.65,2937.5 ; 1292.09,2926.94 cw(c1320,2899.03) v1@1320,2938.5 ; 1298.92,2933.77 cw(c1320,2912.68) v1@1320,2942.5 ; 1305.74,2940.6 cw(c1320,2926.34) v1@1320,2946.5 ; v1(1320,2940) 1308.56,2940 1306.86,2941.71 1280.93,2915.78 ; v1(4690.19,3883.37) 4711.82,3905 4765,3905 4778.59,3918.59 4851.26,3918.59 4855.26,3918.59 4860,3918.59 4870,3918.59 4917.53,3918.59 ; v1@4690.19,3888.87 ccw(c4690.19,3902.15) 4699.58,3892.76 ccw(c4708.97,3883.37) v1@4695.69,3883.37 ; v1@4690.19,3892.87 ccw(c4690.19,3915.81) 4706.41,3899.59 ccw(c4722.63,3883.37) v1@4699.69,3883.37 ; 4917.53,3918.59 ccw(c4917.53,3928.74) 4924.71,3921.56 ; 4917.53,3918.59 ccw(c4917.53,3928.74) 4924.71,3921.56 ; 4924.71,3921.56 ccw(c4912.17,3934.09) 4929.9,3934.09 cw(c4912.17,3934.09) 4924.71,3921.56 ; 4924.71,3921.56 cw(c4937.24,3909.03) 4937.24,3926.75 ccw(c4937.24,3909.03) 4924.71,3921.56
  Bottom Layer w4: v1(1320,2940) 1480,2940 1491,2951 1540,2951 1557,2968 1603.48,2968 1641.01,3005.53 1810.52,3175.04 1840.19,3175.04 1898.52,3233.37 2759.84,3233.37 2810.17,3183.04 4005,3183.04 4015.19,3193.23 4015.19,3268.19 4015.19,3315 4037.52,3337.33 4037.52,3467.04 4032.19,3472.37 4032.19,3512.81 3995,3550 3615.23,3550 3598.52,3566.71 3598.52,3766.71 3604.86,3773.04 4063.19,3773.04 4086.52,3796.37 4374.94,3796.37 4464.86,3706.46 4464.86,3680.14 4470.63,3674.37 4668.9,3674.37 4672.52,3678 4672.52,3865.71 v1(4690.19,3883.37) ; v1@1323.89,2936.11 cw(c1333.28,2926.72) 1333.28,2940 cw(c1333.28,2953.28) v1@1323.89,2943.89 ; v1@1326.72,2933.28 cw(c1342.93,2917.06) 1342.93,2940 cw(c1342.93,2962.93) v1@1326.72,2946.72 ; v1@4680.69,3883.37 cw(c4657.76,3883.37) 4673.97,3867.16 cw(c4690.19,3850.94) v1@4690.19,3873.87 ; v1@4684.69,3883.37 cw(c4671.41,3883.37) 4680.8,3873.99 cw(c4690.19,3864.6) v1@4690.19,3877.87
PBIO.D28: EXTHDR1.58 U8.Y1 | length 6912.8
  Top Layer w4: EXTHDR1.58@1249.43,2806.13 cw(c1249.43,2782.79) 1265.93,2799.3 ; EXTHDR1.58@1249.43,2810.13 cw(c1249.43,2796.45) 1259.11,2806.13 ; EXTHDR1.58@1249.43,2859.25 1249.43,2815.8 1265.19,2800.04 1265.19,2765 1206.86,2706.67 1206.86,2633.37 1206.86,2441.71 1265.19,2383.37 v1(1356.86,2383.37) ; EXTHDR1.58@1257.43,2814.13 ccw(c1272.72,2814.13) 1261.91,2803.32 ; v1@1350.14,2376.66 ccw(c1333.92,2360.44) 1333.92,2383.37 ccw(c1333.92,2406.31) v1@1350.14,2390.09 ; v1@1352.97,2379.49 ccw(c1343.58,2370.1) 1343.58,2383.37 ccw(c1343.58,2396.65) v1@1352.97,2387.26 ; v1@4473.84,3850.78 ccw(c4461.08,3865) 4480.19,3865 ccw(c4499.3,3865) v1@4486.54,3850.78 ; v1@4476.52,3847.8 ccw(c4469.13,3856.03) 4480.19,3856.03 ccw(c4491.25,3856.03) v1@4483.86,3847.8 ; v1(4480.19,3843.71) 4480.19,3865 4471.82,3873.37 4471.82,3940 4480.19,3948.37 4481.86,3950.04 4699.19,3950.04 4707.52,3941.71 4773.52,3941.71 4781.14,3934.09 4860,3934.09 4870,3934.09 U8.Y1@4897.87,3934.09 ; U8.Y1@4892.57,3928.79 ccw(c4879.77,3915.99) 4879.77,3934.09 ccw(c4879.77,3952.2) U8.Y1@4892.57,3939.4 ; 4880.15,3934.09 cw(c4880.15,3916.37) 4892.68,3928.9 ccw(c4880.15,3916.37) 4880.15,3934.09 ; 4880.15,3934.09 ccw(c4880.15,3951.82) 4892.68,3939.29 cw(c4880.15,3951.82) 4880.15,3934.09
  MidLayer1 w4: v1@1356.86,2373.87 cw(c1356.86,2350.94) 1373.07,2367.16 cw(c1389.29,2383.37) v1@1366.36,2383.37 ; v1@1356.86,2377.87 cw(c1356.86,2364.6) 1366.25,2373.99 cw(c1375.64,2383.37) v1@1362.36,2383.37 ; v1(1356.86,2383.37) 1377,2363.23 1377,1904.9 1400.9,1881 1911.63,1881 1951.63,1841 1993.34,1841 2017.63,1816.71 2080,1816.71 2113.29,1850 2395.5,1850 2473.86,1928.35 2473.86,2322.54 2501.81,2350.5 3082.32,2350.5 3631.86,2900.04 3631.86,3541.71 3640.19,3550.04 4065.19,3550.04 4073.52,3558.37 4073.52,3773.37 4056.19,3790.71 v1(4031.86,3790.71) ; v1@4035.75,3786.82 cw(c4045.14,3777.43) 4045.14,3790.71 cw(c4045.14,3803.99) v1@4035.75,3794.6 ; v1@4038.57,3783.99 cw(c4054.79,3767.77) 4054.79,3790.71 cw(c4054.79,3813.64) v1@4038.57,3797.43
  Bottom Layer w4: v1(4031.86,3790.71) 4069.54,3790.71 4083.21,3804.37 4378.25,3804.37 4391.92,3790.71 4427.19,3790.71 v1(4480.19,3843.71) ; v1@4035.75,3786.82 cw(c4045.14,3777.43) 4045.14,3790.71 cw(c4045.14,3803.99) v1@4035.75,3794.6 ; v1@4038.57,3783.99 cw(c4054.79,3767.77) 4054.79,3790.71 cw(c4054.79,3813.64) v1@4038.57,3797.43 ; v1@4470.69,3843.71 cw(c4447.76,3843.71) 4463.97,3827.49 cw(c4480.19,3811.27) v1@4480.19,3834.21 ; v1@4474.69,3843.71 cw(c4461.41,3843.71) 4470.8,3834.32 cw(c4480.19,3824.93) v1@4480.19,3838.21
PBIO.D29: EXTHDR1.60 U8.W3 | length 5840.5
  Top Layer w4: EXTHDR1.60@1217.94,2806.13 cw(c1217.94,2795.28) 1225.61,2802.95 ; EXTHDR1.60@1217.94,2859.25 1217.94,2810.63 v1(1240.19,2788.37) ; EXTHDR1.60@1221.94,2814.13 ccw(c1240.05,2814.13) 1227.24,2801.32 ; EXTHDR1.60@1225.94,2814.13 ccw(c1253.71,2814.13) v1@1234.07,2794.5 ; v1@1230.69,2788.37 ccw(c1207.76,2788.37) 1223.97,2804.59 ccw(c1240.19,2820.81) v1@1240.19,2797.87 ; v1@1234.69,2788.37 ccw(c1221.41,2788.37) 1230.8,2797.76 ccw(c1240.19,2807.15) v1@1240.19,2793.87 ; v1@4698.52,2897.21 ccw(c4698.52,2910.49) 4707.91,2901.1 ccw(c4717.3,2891.71) v1@4704.02,2891.71 ; v1@4698.52,2901.21 ccw(c4698.52,2924.14) 4714.74,2907.93 ccw(c4730.96,2891.71) v1@4708.02,2891.71 ; v1@4706.86,2891.71 v1(4698.52,2891.71) 4721.26,2914.45 4759.95,2914.45 4790.19,2944.69 4790.19,3141.71 4773.52,3158.37 4740.19,3158.37 4723.52,3175.04 4723.52,3225.04 4731.19,3232.71 4731.19,3325.71 4723.52,3333.37 4723.52,3363.73 4703.54,3383.71 4681.52,3383.71 ; U8.W3@4969.27,3973.46 cw(c4951.55,3973.46) 4964.08,3960.93 ; U8.W3@4976.61,3966.12 ccw(c4976.61,3948.4) 4964.08,3960.93 ; 4665.19,3400.04 4675.19,3390.04 ; 4665.19,3400.04 4675.19,3390.04 ; 4665.19,3400.04 4665.19,3658.37 4648.52,3675.04 4490.19,3675.04 4481.86,3683.37 4481.86,3778.63 4462.52,3797.96 4462.52,3942.37 4478.52,3958.37 4702.19,3958.37 4710.86,3949.71 4776.84,3949.71 4776.94,3949.6 4851.26,3949.6 4855.26,3949.6 4860,3949.6 4870,3949.6 4936.73,3949.6 ccw(c4936.73,3988.28) 4964.08,3960.93 ; 4675.19,3390.04 4681.52,3383.71 ; 4675.19,3390.04 4681.52,3383.71
  MidLayer2 w4: v1(1240.19,2788.37) 1240.19,2791.71 1256.86,2808.37 ; v1@1240.19,2797.87 ccw(c1240.19,2812.76) 1250.72,2802.24 ; v1@1245.68,2788.77 cw(c1262.84,2790.02) 1250.67,2802.19 ; v1@1249.67,2789.06 cw(c1274.37,2790.86) 1256.86,2808.37 ; v1@4691.81,2884.99 ccw(c4675.59,2868.77) 4675.59,2891.71 ccw(c4675.59,2914.64) v1@4691.81,2898.43 ; v1@4694.64,2887.82 ccw(c4685.25,2878.43) 4685.25,2891.71 ccw(c4685.25,2904.99) v1@4694.64,2895.6 ; v1(4698.52,2891.71) 4323.96,2891.71 4273.63,2841.37 3319.54,2841.37 3236.21,2758.04 3005.33,2758.04 2980,2783.37 2150,2783.37 2128.88,2783.37 1975,2783.37 1950,2808.37 1256.86,2808.37
PBIO.D30: EXTHDR1.62 U8.W4 | length 5019.4
  Top Layer w4: v1(1173.52,2975.04) 1173.52,2960.67 1189.19,2945 1189.19,2917.71 1190.19,2916.71 ; EXTHDR1.62@1186.05,2912.36 ccw(c1185.84,2916.71) 1190.19,2916.71 ; EXTHDR1.62@1190.19,2883.37 1190.19,2916.71 ; 1190.19,2914.63 ccw(c1196.7,2914.63) EXTHDR1.62@1192.1,2910.03 ; v3(4996.3,3953.78) U8.W4@5015.98,3973.46 ; U8.W4@5008.48,3973.46 cw(c4990.38,3973.46) 5003.18,3960.66 cw(c5015.98,3947.86) U8.W4@5015.98,3965.96 ; U8.W4@5008.64,3973.46 cw(c4990.92,3973.46) 5003.45,3960.93 cw(c5015.98,3948.4) U8.W4@5015.98,3966.12 ; 5009.1,3966.58 ccw(c5021.91,3953.78) 5003.8,3953.78 cw(c5021.91,3953.78) 5009.1,3966.58 ; 5009.1,3966.58 cw(c4996.3,3979.39) 4996.3,3961.28 ccw(c4996.3,3979.39) 5009.1,3966.58
  MidLayer1 w4: v1@4697.36,3632.37 ccw(c4674.42,3632.37) 4690.64,3648.59 ccw(c4706.86,3664.81) v1@4706.86,3641.87 ; v1@4701.36,3632.37 ccw(c4688.08,3632.37) 4697.47,3641.76 ccw(c4706.86,3651.15) v1@4706.86,3637.87 ; v1(4706.86,3632.37) 4690.19,3649.04 4690.19,3691.71 4698.52,3700.04 4731.86,3700.04 4754.19,3722.37 4754.19,3782.12 4731.19,3805.12 4731.19,3939.88 4733.02,3941.71 4755,3941.71 4767.07,3953.78 4860,3953.78 4870,3953.78 4918.62,3953.78 v3(4996.3,3953.78) ; v3@4991,3948.48 ccw(c4978.19,3935.67) 4978.19,3953.78 ccw(c4978.19,3971.89) v3@4991,3959.08 ; v3@4991.11,3948.59 ccw(c4978.57,3936.05) 4978.57,3953.78 ccw(c4978.57,3971.51) v3@4991.11,3958.97
  MidLayer2 w4: v1(1173.52,2975.04) 1390.19,3191.71 1659.71,3191.71 1685,3217 1721.69,3217 1746.98,3191.71 1850,3191.71 1891.67,3233.37 2178,3233.37 2723.52,3233.37 2798.52,3308.37 3756.86,3308.37 3773.52,3325.04 4006.86,3325.04 4048.52,3366.71 4099.5,3366.71 4122.4,3389.61 4123.52,3390.73 4123.52,3425.04 4181.86,3483.37 4498.52,3483.37 4565.19,3550.04 4615.19,3550.04 4706.86,3641.71 v1(4706.86,3632.37) ; v1@1173.52,2980.54 ccw(c1173.52,2993.82) 1182.91,2984.43 ccw(c1192.3,2975.04) v1@1179.02,2975.04 ; v1@1173.52,2984.54 ccw(c1173.52,3007.48) 1189.74,2991.26 ccw(c1205.96,2975.04) v1@1183.02,2975.04 ; 4674.71,3609.56 cw(c4706.86,3577.41) v1@4706.86,3622.87 ; 4681.54,3616.39 cw(c4706.86,3591.06) v1@4706.86,3626.87 ; 4688.36,3623.21 cw(c4706.86,3604.72) v1@4706.86,3630.87 ; 4695.19,3630.04 cw(c4706.86,3618.38) v1@4706.86,3634.87
PBIO.D31: EXTHDR1.64 U8.V6 | length 5307.2
  Top Layer w4: 1148.52,2917.28 ccw(c1164.72,2917.28) 1154.94,2904.37 1148.52,2904.36 1148.52,2933.37 ; 1148.52,2925.33 ccw(c1170.81,2925.33) EXTHDR1.64@1157.36,2907.56 ; 1148.69,2933.54 cw(c1158.27,2923.96) v1@1163.19,2936.58 ; 1153.02,2937.87 cw(c1160.7,2930.19) v1@1164.65,2940.31 ; EXTHDR1.64@1154.94,2859.25 EXTHDR1.64@1154.95,2904.36 ; EXTHDR1.64@1159.77,2910.75 cw(c1176.91,2933.37) 1148.52,2933.37 ; v1(1165.19,2941.71) 1156.86,2941.71 1148.52,2933.37 ; v3(5075.04,3993.15) U8.V6@5094.72,4012.83 ; v3@5082.54,3993.15 cw(c5100.65,3993.15) 5087.84,4005.95 ; v3@5082.54,3993.15 cw(c5100.65,3993.15) 5087.84,4005.95 ; U8.V6@5087.22,4012.83 cw(c5069.12,4012.83) 5081.92,4000.03 cw(c5094.72,3987.23) U8.V6@5094.72,4005.33 ; U8.V6@5087.38,4012.83 cw(c5069.66,4012.83) 5082.19,4000.3 cw(c5094.72,3987.77) U8.V6@5094.72,4005.49 ; 5087.84,4005.95 cw(c5075.04,4018.76) 5075.04,4000.65 ccw(c5075.04,4018.76) 5087.84,4005.95
  MidLayer1 w4: v1@4726.14,3773.43 ccw(c4709.92,3789.64) 4732.86,3789.64 ccw(c4755.79,3789.64) v1@4739.57,3773.43 ; v1@4728.97,3770.6 ccw(c4719.58,3779.99) 4732.86,3779.99 ccw(c4746.14,3779.99) v1@4736.75,3770.6 ; v1(4732.86,3766.71) 4732.86,3792.14 4723.19,3801.81 4723.19,3943.19 4730.04,3950.04 4752.02,3950.04 4771.27,3969.29 4860,3969.29 4870,3969.29 4918.62,3969.29 4938.04,3969.29 5012.16,3969.29 ; 4998.23,3969.29 5012.16,3969.29 ; v3@5067.57,3993.8 cw(c5049.53,3995.38) 5061.17,3981.51 ; v3@5074.39,3985.68 ccw(c5072.81,3967.64) 5061.17,3981.51 ; 5012.16,3969.29 5031.66,3969.29 ccw(c5031.66,4011.02) 5061.17,3981.51
  MidLayer2 w4: v1(1165.19,2941.71) 1215.19,2991.71 1215.19,3001.16 1389.07,3175.04 1675.96,3175.04 1697,3154 1735.82,3154 1765.19,3183.37 1852.98,3183.37 1894.98,3225.37 2766.33,3225.37 2775,3216.71 2973.52,3216.71 3031.86,3275.04 3090.19,3275.04 3132.19,3233.04 3286.21,3233.04 3328.21,3275.04 4087.21,3275.04 4162.09,3349.92 4175,3362.83 4175,3460 4190.04,3475.04 4440.19,3475.04 4456.86,3458.37 4456.86,3450.04 4467.52,3439.37 4506.86,3439.37 4575.86,3508.37 4588.37,3508.37 4690,3610 4735,3610 4790.19,3665.19 4790.19,3750.04 4773.52,3766.71 v1(4732.86,3766.71) ; v1@1165.19,2947.21 ccw(c1165.19,2960.49) 1174.58,2951.1 ccw(c1183.97,2941.71) v1@1170.69,2941.71 ; v1@1165.19,2951.21 ccw(c1165.19,2974.14) 1181.41,2957.93 ccw(c1197.63,2941.71) v1@1174.69,2941.71 ; v1@4736.75,3762.82 cw(c4746.14,3753.43) 4746.14,3766.71 cw(c4746.14,3779.99) v1@4736.75,3770.6 ; v1@4739.57,3759.99 cw(c4755.79,3743.77) 4755.79,3766.71 cw(c4755.79,3789.64) v1@4739.57,3773.43
PBIO.D32: EXTHDR1.66 U8.V7 | length 8892.8
  Top Layer w4: EXTHDR1.66@1117.79,2808.48 cw(c1104.13,2794.82) 1123.45,2794.82 cw(c1142.76,2794.82) EXTHDR1.66@1129.1,2808.48 ; EXTHDR1.66@1123.45,2859.25 1123.45,2425.12 1165.19,2383.37 v1(1165.19,2150.04) ; v1@1158.47,2156.76 ccw(c1142.26,2172.98) 1165.19,2172.98 ccw(c1188.13,2172.98) v1@1171.91,2156.76 ; v1@1161.3,2153.93 ccw(c1151.91,2163.32) 1165.19,2163.32 ccw(c1178.47,2163.32) v1@1169.08,2153.93 ; v1@2408.47,3347.99 cw(c2392.26,3331.77) 2415.19,3331.77 cw(c2438.13,3331.77) v1@2421.91,3347.99 ; v1@2411.3,3350.82 cw(c2401.91,3341.43) 2415.19,3341.43 cw(c2428.47,3341.43) v1@2419.08,3350.82 ; v1(2415.19,3354.71) 2415.19,3211.36 3005.69,2620.86 3034.14,2620.86 3040.19,2614.81 v1(3040.19,2600.04) ; v3(5114.41,3993.15) U8.V7@5134.09,4012.83 ; v3@5121.91,3993.15 cw(c5140.02,3993.15) 5127.21,4005.95 ; v3@5121.91,3993.15 cw(c5140.02,3993.15) 5127.21,4005.95 ; U8.V7@5126.59,4012.83 cw(c5108.49,4012.83) 5121.29,4000.03 cw(c5134.09,3987.23) U8.V7@5134.09,4005.33 ; U8.V7@5126.75,4012.83 cw(c5109.03,4012.83) 5121.56,4000.3 cw(c5134.09,3987.77) U8.V7@5134.09,4005.49 ; 5127.21,4005.95 cw(c5114.41,4018.76) 5114.41,4000.65 ccw(c5114.41,4018.76) 5127.21,4005.95
  MidLayer1 w4: v1@1790.19,2140.54 cw(c1790.19,2117.61) 1806.41,2133.82 cw(c1822.63,2150.04) v1@1799.69,2150.04 ; v1@1790.19,2144.54 cw(c1790.19,2131.26) 1799.58,2140.65 cw(c1808.97,2150.04) v1@1795.69,2150.04 ; v1(1790.19,2150.04) 1812.23,2128 1918.31,2128 1938,2108.31 1938,1913.55 1978.55,1873 2018.25,1873 2027.75,1882.5 2042.25,1882.5 2064.75,1860 2394.19,1860 2465.86,1931.67 2465.86,2325.86 2498.5,2358.5 3043.5,2358.5 v1(3065,2380) ; v1@3055.5,2380 cw(c3032.56,2380) 3048.78,2363.78 cw(c3065,2347.56) v1@3065,2370.5 ; v1@3059.5,2380 cw(c3046.22,2380) 3055.61,2370.61 cw(c3065,2361.22) v1@3065,2374.5
  MidLayer2 w4: v1(1165.19,2150.04) 1190,2150.04 1195,2155.04 1195,2223.69 1247.69,2276.37 1406,2276.37 1478.37,2204 1542.55,2204 1598.55,2260 1650.04,2260 1760,2150.04 v1(1790.19,2150.04) ; v1@1169.08,2146.15 cw(c1178.47,2136.76) 1178.47,2150.04 cw(c1178.47,2163.32) v1@1169.08,2153.93 ; v1@1171.91,2143.32 cw(c1188.13,2127.11) 1188.13,2150.04 cw(c1188.13,2172.98) v1@1171.91,2156.76 ; v1@1783.47,2143.32 ccw(c1767.26,2127.11) 1767.26,2150.04 ccw(c1767.26,2172.98) v1@1783.47,2156.76 ; v1@1786.3,2146.15 ccw(c1776.91,2136.76) 1776.91,2150.04 ccw(c1776.91,2163.32) v1@1786.3,2153.93 ; v1(2415.19,3354.71) 2603.19,3354.71 2623.52,3375.04 2623.52,3525.04 2648.52,3550.04 2898.52,3550.04 2931.86,3583.37 2931.86,3641.71 2948.52,3658.37 3405,3658.37 3431.52,3684.9 3431.52,4045.21 3448.31,4062 3622,4062 3660.71,4100.71 4061.54,4100.71 4112.21,4050.04 4298.52,4050.04 4404.52,3944.04 4442.52,3944.04 4456.86,3958.37 4693.17,3958.37 4701.55,3950 4762.78,3950 4790.42,3977.64 4860,3977.64 4870,3977.64 4997.36,3977.64 5090.9,3977.64 ccw(c5090.9,3991.69) 5100.83,3981.76 ; v1@2419.08,3350.82 cw(c2428.47,3341.43) 2428.47,3354.71 cw(c2428.47,3367.99) v1@2419.08,3358.6 ; v1@2421.91,3347.99 cw(c2438.13,3331.77) 2438.13,3354.71 cw(c2438.13,3377.64) v1@2421.91,3361.43 ; v3@5106.94,3993.8 cw(c5088.9,3995.38) 5100.54,3981.51 cw(c5112.18,3967.64) v3@5113.76,3985.68
  Bottom Layer w4: v1@3033.47,2593.32 cw(c3017.26,2577.11) 3040.19,2577.11 cw(c3063.13,2577.11) v1@3046.91,2593.32 ; v1@3036.3,2596.15 cw(c3026.91,2586.76) 3040.19,2586.76 cw(c3053.47,2586.76) v1@3044.08,2596.15 ; v1(3040.19,2600.04) 3040.19,2404.81 v1(3065,2380) ; v1@3055.5,2380 ccw(c3032.56,2380) 3048.78,2396.22 ccw(c3065,2412.43) v1@3065,2389.5 ; v1@3059.5,2380 ccw(c3046.22,2380) 3055.61,2389.39 ccw(c3065,2398.78) v1@3065,2385.5
PBIO.D33: EXTHDR1.68 U8.U8 | length 6466.8
  Top Layer w4: v1@1083.47,2731.76 ccw(c1067.26,2747.98) 1090.19,2747.98 ccw(c1113.13,2747.98) v1@1096.91,2731.76 ; EXTHDR1.68@1086.29,2808.48 cw(c1072.64,2794.82) 1091.95,2794.82 cw(c1111.27,2794.82) EXTHDR1.68@1097.61,2808.48 ; v1@1086.3,2728.93 ccw(c1076.91,2738.32) 1090.19,2738.32 ccw(c1103.47,2738.32) v1@1094.08,2728.93 ; v1(1090.19,2725.04) 1090.19,2758.37 1098.52,2766.71 1098.52,2780 1091.95,2786.57 EXTHDR1.68@1091.95,2859.25 ; v3(5153.78,4032.52) U8.U8@5173.46,4052.2 ; U8.U8@5165.96,4052.2 cw(c5147.86,4052.2) 5160.66,4039.4 cw(c5173.46,4026.6) U8.U8@5173.46,4044.7 ; U8.U8@5166.12,4052.2 cw(c5148.4,4052.2) 5160.93,4039.67 cw(c5173.46,4027.14) U8.U8@5173.46,4044.86 ; 5166.58,4045.32 cw(c5153.78,4058.13) 5153.78,4040.02 ccw(c5153.78,4058.13) 5166.58,4045.32 ; 5166.58,4045.32 ccw(c5179.39,4032.52) 5161.28,4032.52 cw(c5179.39,4032.52) 5166.58,4045.32
  MidLayer1 w4: v1(3481.86,2583.37) 3594.94,2583.37 3660,2648.44 3660,2735.75 3690.19,2765.94 v1(3690.19,3350.04) ; v1@3485.75,2579.49 cw(c3495.14,2570.1) 3495.14,2583.37 cw(c3495.14,2596.65) v1@3485.75,2587.26 ; v1@3488.57,2576.66 cw(c3504.79,2560.44) 3504.79,2583.37 cw(c3504.79,2606.31) v1@3488.57,2590.09 ; v1@3683.47,3343.32 cw(c3667.26,3327.11) 3690.19,3327.11 cw(c3713.13,3327.11) v1@3696.91,3343.32 ; v1@3686.3,3346.15 cw(c3676.91,3336.76) 3690.19,3336.76 cw(c3703.47,3336.76) v1@3694.08,3346.15
  MidLayer2 w4: v1(1090.19,2725.04) 1939.96,2725.04 2097,2568 3052.96,2568 3093.67,2608.71 3456.52,2608.71 v1(3481.86,2583.37) ; v1@1094.08,2721.15 cw(c1103.47,2711.76) 1103.47,2725.04 cw(c1103.47,2738.32) v1@1094.08,2728.93 ; v1@1096.91,2718.32 cw(c1113.13,2702.11) 1113.13,2725.04 cw(c1113.13,2747.98) v1@1096.91,2731.76 ; v1@3472.36,2583.37 ccw(c3449.42,2583.37) 3465.64,2599.59 ccw(c3481.86,2615.81) v1@3481.86,2592.87 ; v1@3476.36,2583.37 ccw(c3463.08,2583.37) 3472.47,2592.76 ccw(c3481.86,2602.15) v1@3481.86,2588.87 ; v1@4448.52,4031.21 cw(c4448.52,4008.27) 4464.74,4024.49 cw(c4480.96,4040.71) v1@4458.02,4040.71 ; v1@4448.52,4035.21 cw(c4448.52,4021.93) 4457.91,4031.32 cw(c4467.3,4040.71) v1@4454.02,4040.71 ; v1(4448.52,4040.71) 4471.52,4017.71 4645.15,4017.71 4704.48,3958.37 4759.84,3958.37 4810.12,4008.66 4860,4008.66 4870,4008.66 4997.36,4008.66 5016.78,4008.66 5090.9,4008.66 5110.4,4008.66 ccw(c5110.4,4050.39) 5139.91,4020.88 ; v3@5146.31,4033.17 cw(c5128.27,4034.75) 5139.91,4020.88 ; v3@5153.13,4025.05 ccw(c5151.55,4007.01) 5139.91,4020.88
  Bottom Layer w4: v1@3683.47,3343.32 ccw(c3667.26,3327.11) 3667.26,3350.04 ccw(c3667.26,3372.98) v1@3683.47,3356.76 ; v1@3686.3,3346.15 ccw(c3676.91,3336.76) 3676.91,3350.04 ccw(c3676.91,3363.32) v1@3686.3,3353.93 ; v1(3690.19,3350.04) 3648.52,3350.04 3631.86,3366.71 3631.86,3405.37 3573.52,3463.71 3573.52,3836.36 3620.21,3883.04 3939.67,3883.04 4028.67,3972.04 4348.52,3972.04 4409.25,4032.77 4417.19,4040.71 v1(4448.52,4040.71) ; v1@4441.81,4033.99 ccw(c4425.59,4017.77) 4425.59,4040.71 ccw(c4425.59,4063.64) v1@4441.81,4047.43 ; v1@4444.64,4036.82 ccw(c4435.25,4027.43) 4435.25,4040.71 ccw(c4435.25,4053.99) v1@4444.64,4044.6
PBIO.D34: EXTHDR1.70 U8.U9 | length 6069.2
  Top Layer w4: EXTHDR1.70@1054.8,2808.48 cw(c1041.14,2794.82) 1060.46,2794.82 cw(c1079.77,2794.82) EXTHDR1.70@1066.11,2808.48 ; EXTHDR1.70@1060.46,2866.71 EXTHDR1.70@1060.46,2859.25 1060.46,2792.78 v1(1073.52,2779.71) ; v3(5193.15,4032.52) U8.U9@5212.83,4052.2 ; U8.U9@5205.33,4052.2 cw(c5187.23,4052.2) 5200.03,4039.4 cw(c5212.83,4026.6) U8.U9@5212.83,4044.7 ; U8.U9@5205.49,4052.2 cw(c5187.77,4052.2) 5200.3,4039.67 cw(c5212.83,4027.14) U8.U9@5212.83,4044.86 ; 5205.95,4045.32 cw(c5193.15,4058.13) 5193.15,4040.02 ccw(c5193.15,4058.13) 5205.95,4045.32 ; 5205.95,4045.32 ccw(c5218.76,4032.52) 5200.65,4032.52 cw(c5218.76,4032.52) 5205.95,4045.32
  MidLayer1 w4: v1@4200.14,2798.43 ccw(c4183.92,2814.64) 4206.86,2814.64 ccw(c4229.79,2814.64) v1@4213.57,2798.43 ; v1@4202.97,2795.6 ccw(c4193.58,2804.99) 4206.86,2804.99 ccw(c4220.14,2804.99) v1@4210.75,2795.6 ; v1(4206.86,2791.71) 4206.86,2946.71 4373.52,3113.37 4373.52,3225.04 4348.84,3249.72 4343.09,3249.72 4304.52,3288.29 4304.52,3714.52 4323.37,3733.37 4381.86,3733.37 4401.86,3753.37 v1(4401.86,3808.37) ; v1@4395.14,3801.66 cw(c4378.92,3785.44) 4401.86,3785.44 cw(c4424.79,3785.44) v1@4408.57,3801.66 ; v1@4397.97,3804.49 cw(c4388.58,3795.1) 4401.86,3795.1 cw(c4415.14,3795.1) v1@4405.75,3804.49
  MidLayer2 w4: v1(1073.52,2779.71) 1118.86,2779.71 1165.19,2733.37 1959.31,2733.37 1985.31,2759.37 2969.71,2759.37 2995.04,2734.04 3139.65,2734.04 3194.65,2679.04 3580,2679.04 3676,2775.04 4165.19,2775.04 4181.86,2791.71 v1(4206.86,2791.71) ; v1@1077.41,2775.82 cw(c1086.8,2766.43) 1086.8,2779.71 cw(c1086.8,2792.99) v1@1077.41,2783.6 ; v1@1080.24,2772.99 cw(c1096.46,2756.77) 1096.46,2779.71 cw(c1096.46,2802.64) v1@1080.24,2786.43 ; v1@4200.14,2784.99 ccw(c4183.92,2768.77) 4183.92,2791.71 ccw(c4183.92,2814.64) v1@4200.14,2798.43 ; v1@4202.97,2787.82 ccw(c4193.58,2778.43) 4193.58,2791.71 ccw(c4193.58,2804.99) v1@4202.97,2795.6
  Bottom Layer w4: v1@4401.86,3805.87 ccw(c4401.86,3823.52) 4414.34,3811.04 ; v1(4401.86,3808.37) 4411.67,3808.37 4470,3866.71 4481.52,3866.71 4489.86,3875.04 4489.86,3948.37 4491.52,3950.04 4666.86,3950.04 4668.52,3948.37 4670,3946.9 4670,3915.23 4680.23,3905 4803.48,3905 4815.19,3916.71 4815.19,4000.04 4831.86,4016.71 4851.26,4016.71 4851.26,4017.01 4855.26,4017.01 4860,4017.01 4870,4017.01 5076.1,4017.01 5169.64,4017.01 ccw(c5169.64,4031.06) 5179.57,4021.13 ; v1@4401.86,3809.87 ccw(c4401.86,3837.18) 4421.16,3817.87 ; v1@4401.86,3813.87 ccw(c4401.86,3850.84) 4427.99,3824.7 ; v1@4401.86,3817.87 ccw(c4401.86,3864.49) 4434.82,3831.53 ; v3@5185.68,4033.17 cw(c5167.64,4034.75) 5179.28,4020.88 cw(c5190.92,4007.01) v3@5192.5,4025.05